# Altium PCB PCB_Gemas.PcbDoc (part 2 of 2)
Units mm, origin at the board's own origin, x right, y up, seen from the top; angles counter-clockwise.
Board outline 100 x 71 mm, 2 copper layers (Top Layer, Bottom Layer); 85 components, 61 nets, 758 pads, 66 vias.
Unrouted connection lines stored in the file: 1.
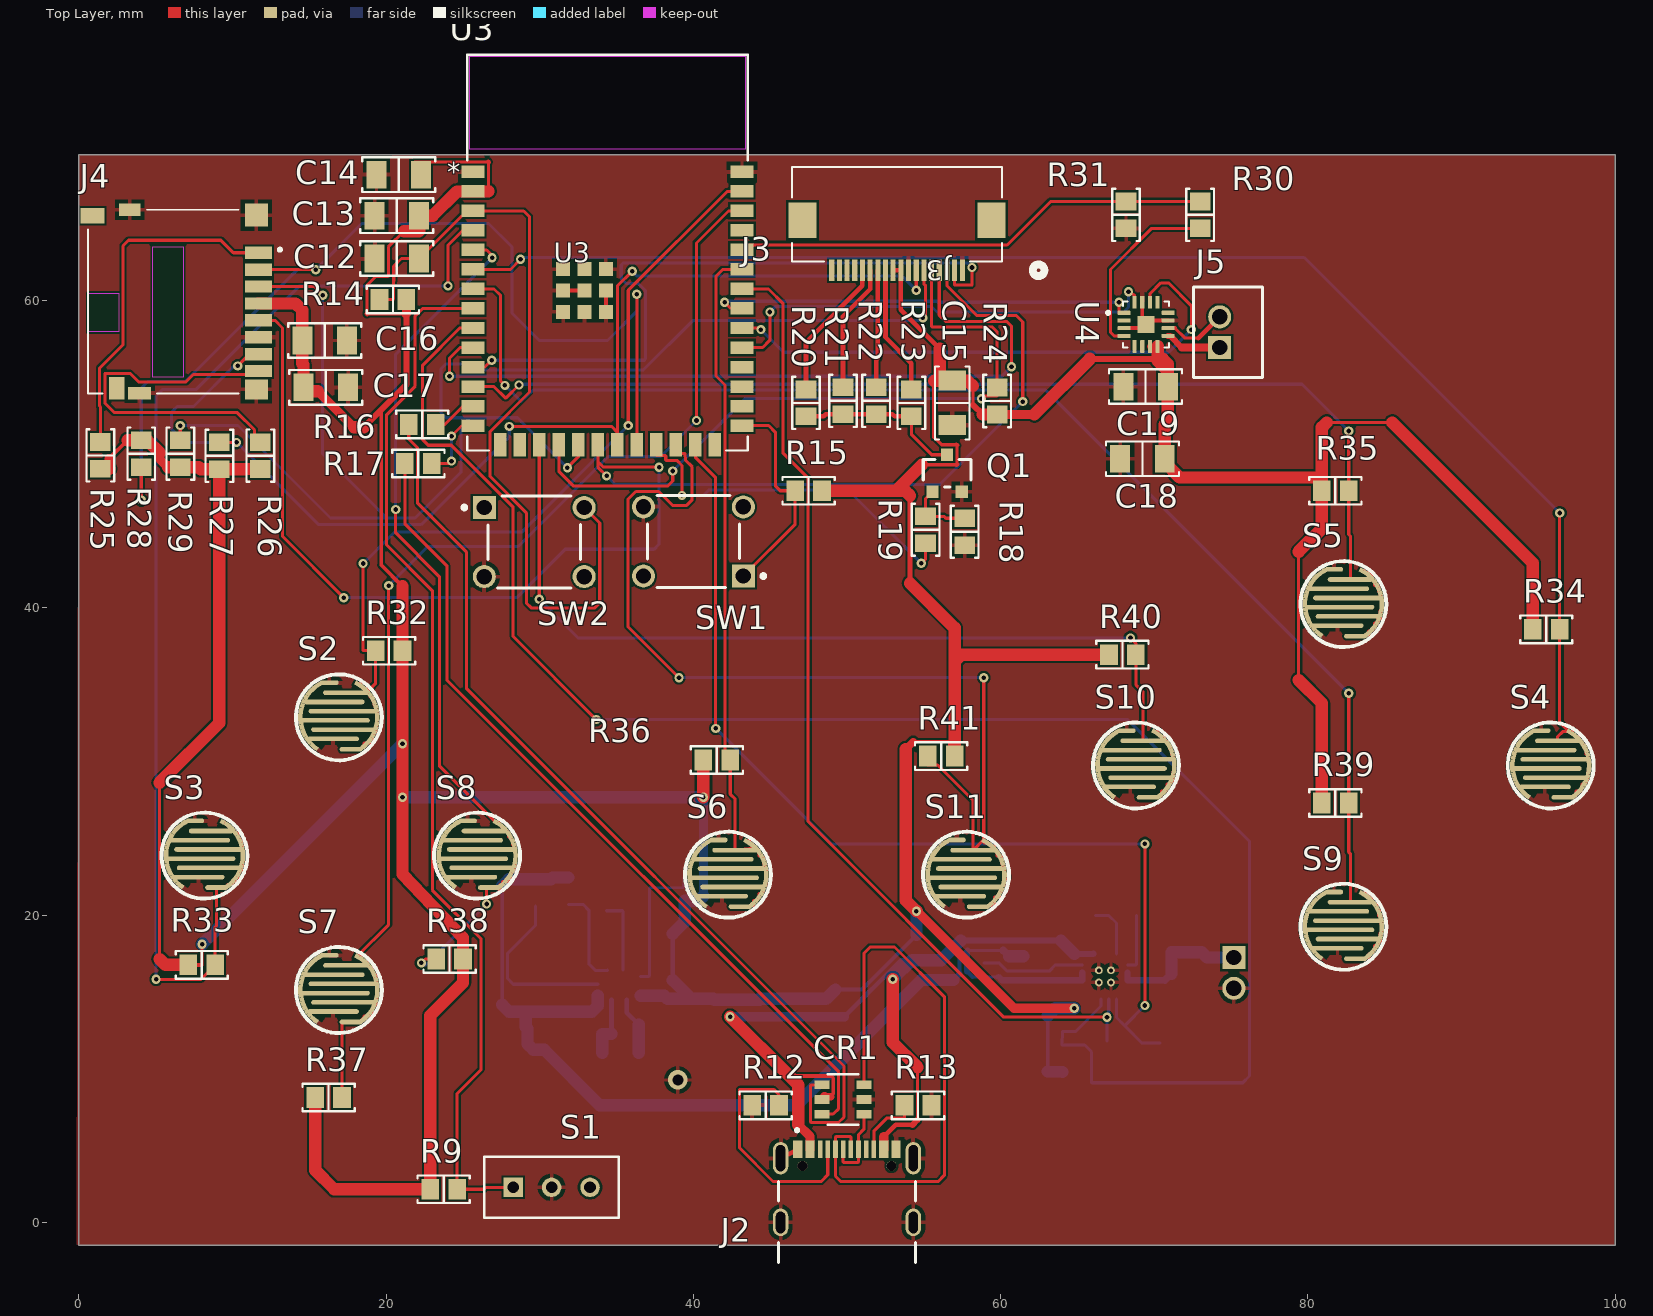
[diagram p0: Top Layer view]

## Via types
v1: diameter 0.6, hole 0.3, Top Layer to Bottom Layer, 65 vias
v2: diameter 1.27, hole 0.711, Top Layer to Bottom Layer, 1 vias

## Nets (pads, with @x,y where several pads share a name; then routed paths per layer and width w, separated by ;. In a path a pad name is that pad's centre, name@x,y a point inside that pad or via, vN(x,y) a via of type N, cw(c..) or ccw(c..) an arc to the next point about the centre after c; other vN are vias at no path point) (continued)
VSYS: (continued)
  Bottom Layer w0.4: 56.909,15.773 57.328,16.192 ; 57.81,16.332 57.81,17.666 57.848,17.704 ; 59.868,15.977 60.08,15.765 U1.10 U1.11
  Bottom Layer w0.5: 60.175,17.704 60.554,17.325
  Bottom Layer w0.8: 27.559,14.16 28.003,13.716 C9.2 ; 27.559,21.907 27.99,22.338 R10.1 30.734,22.338 30.847,22.451 R11.1 ; U2.12-13 33.776,14.091 33.401,13.716 C10.2 C9.2 ; 56.909,15.773 54.831,15.773 46.677,7.62 33.909,7.62 30.293,11.236 29.584,11.236 C8.2 29.21,12.598 29.083,12.725 C9.2 ; 60.554,17.325 C2.2
pads on no net: J2. J2.A8 J2.B8 J3.15 J3.16 J3.17 J3.18 J3.19 J3.20 J4.SW-A J4.SW-B S1.3 SW1.2 SW1.3 SW2.1 SW2.4 U1.9 U1.14 U1.15 U1.V U2.2 U2.6 U3.15 U3.16 U3.26 U3.28 U3.29 U3.30 U3.37 U4.2 U4.5 U4.6 U4.12 U4.13

## Polygon pours and split planes (outlines as drawn)
GND on Bottom Layer "NONET_L-01_P-001" (solid, pour order 2): 0,69.5 0,-1.5 100,-1.5 100,69.5
GND on Bottom Layer "NONET_L-01_P-001" (solid, pour order 1): 0,69.5 0,-1.5 100,-1.5 100,69.5
GND on Bottom Layer "NONET_L-01_P-001" (solid, pour order 0): 92.964,79.756 92.964,79.883 93.091,80.01
GND on Top Layer "NONET_L-01_P-001" (solid, pour order 3): -0.127,-1.524 99.949,-1.524 99.949,69.469 0,69.469

## Silkscreen, mask and mechanical layers (free items; w line width, h text height)
Mechanical 1:
  the board outline again, w0.254

## Text inside footprints (layer, text, board x,y; h text height)
CR1: Mechanical 13 "*" at 50.545,7.823 h1.27 r180
J2: Mechanical 13 "PCB EDGE" at 55.4,-2.5 h0.41
S1: Mechanical 13 "*" at 28.909,0.495 h1.27 r90
U1: Mechanical 13 "*" at 67.903,16.38 h1.27
U3: Top Overlay "*" at 23.965,67.744 h1.27; Mechanical 13 "*" at 26.734,67.744 h1.27